# Altium PCB ISC-nRF52840-A-MODULE-Position-5.PcbDoc
Units mil, origin at the board's own origin, x right, y up, seen from the top; angles counter-clockwise.
Board outline 1740 x 1640 mil, 2 copper layers (Top Layer, Bottom Layer); 1 components, 0 nets, 55 pads, 0 vias.
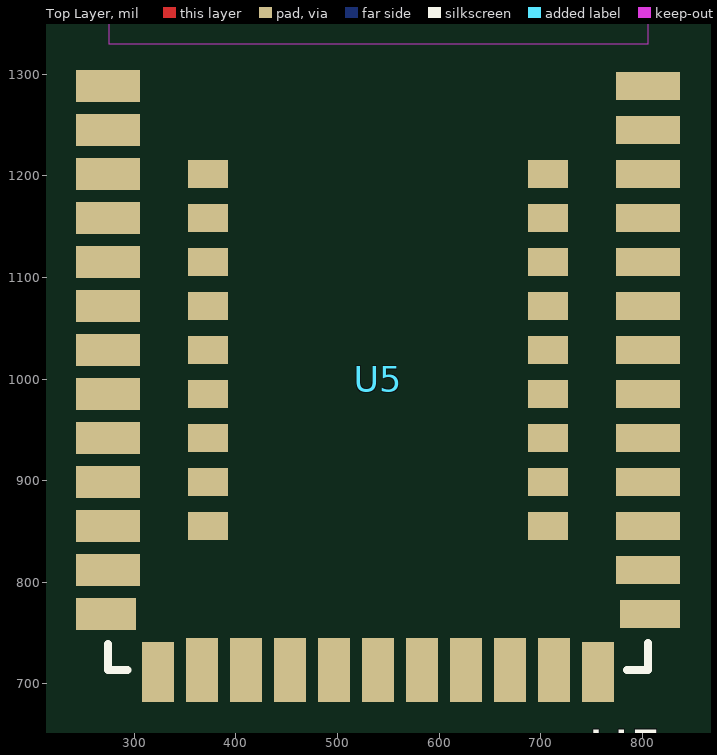
[diagram p0: Top Layer view]
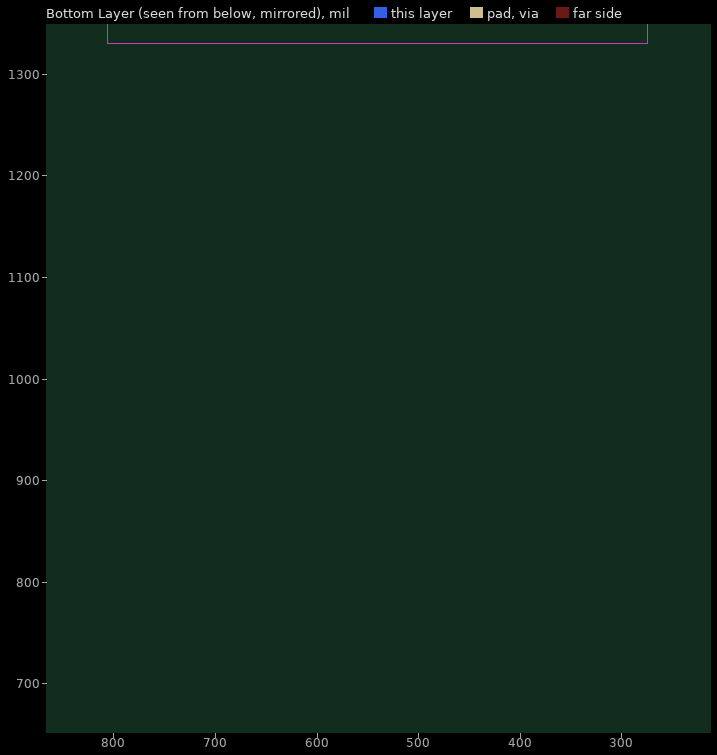
[diagram p1: Bottom Layer view, seen from below]

## Layer stack, top to bottom
Top Solder: solder mask 0.4, Solder Resist, Dk 3.5
Top Layer: signal copper 1.4
Dielectric 1: dielectric 12.6, FR-4, Dk 4.8
Bottom Layer: signal copper 1.4
Bottom Solder: solder mask 0.4, Solder Resist, Dk 3.5

## Board outline
0,0 1740,0 1740,1640 0,1640

## Design rules (kind name [scope] priority, off if disabled: settings)
Clearance [All] p1: gap=10 ignorepadtopadclearanceinfootprint=FALSE
PolygonConnect [All] p1: connectstyle=Relief reliefconductorwidth=10 reliefentries=4 polygonreliefangle="90 Angle" airgapwidth=10
RoutingVias [All] p1: holewidth=28 width=50 viastyle="Through Hole" minholewidth=28 minwidth=50 maxholewidth=28 maxwidth=50
SolderMaskExpansion [All] p1: expansion=4 istentingtop=FALSE
Width [All] p1: maxlimit=10 minlimit=10 preferedwidth=10
30 further rules are at their usual default settings.

## Components (designator, comment, footprint, x,y, rotation, side; value= is the part's Value field where it differs from the comment)
U5 "ISC-nRF52840-A" ISC-nRF52840-MODULE 540,1000 r0 top (schematic designator U1)

## Footprints (in the part's own frame and the unit in brackets; to place one, negate y for a bottom-side part, rotate by r counter-clockwise, add the part's x,y. Pads: shape width x height; smd on the part's side, far side on the other; paste and mask are expansions set on the pad)
ISC-nRF52840-MODULE [mm]
  rect 1.6x0.8 smd mask+0.05: 1(-6.75,7.325) 2(-6.75,6.225) 3(-6.75,5.125) 4(-6.75,4.025) 5(-6.75,2.925) 6(-6.75,1.825) 7(-6.75,0.725) 8(-6.75,-0.375) 9(-6.75,-1.475) 10(-6.75,-2.575) 11(-6.75,-3.675) 12(-6.75,-4.775)
  rect 1.5x0.8 smd mask+0.05: 13(-6.8,-5.875)
  rect 0.8x1.5 smd mask+0.05: 14(-5.5,-7.325) 24(5.5,-7.325)
  rect 0.8x1.6 smd mask+0.05: 15(-4.4,-7.275) 16(-3.3,-7.275) 17(-2.2,-7.275) 18(-1.1,-7.275) 19(0,-7.275) 20(1.1,-7.275) 21(2.2,-7.275) 22(3.3,-7.275) 23(4.4,-7.275)
  rect 1.5x0.7 smd mask+0.05: 25(6.8,-5.875)
  rect 1.6x0.7 smd mask+0.05: 26(6.75,-4.775) 27(6.75,-3.675) 28(6.75,-2.575) 29(6.75,-1.475) 30(6.75,-0.375) 31(6.75,0.725) 32(6.75,1.825) 33(6.75,2.925) 34(6.75,4.025) 35(6.75,5.125) 36(6.75,6.225) 37(6.75,7.325)
  rect 1x0.7 smd mask+0.05: 38(-4.25,5.125) 39(-4.25,4.025) 40(-4.25,2.925) 41(-4.25,1.825) 42(-4.25,0.725) 43(-4.25,-0.375) 44(-4.25,-1.475) 45(-4.25,-2.575) 46(-4.25,-3.675) 47(4.25,5.125) 48(4.25,4.025) 49(4.25,2.925) 50(4.25,1.825) 51(4.25,0.725) 52(4.25,-0.375) 53(4.25,-1.475) 54(4.25,-2.575) 55(4.25,-3.675)
  Keep-Out Layer region: -6.731,8.382 6.759,8.382 6.759,11.235 -6.731,11.235
  silkscreen extent -6.75,-7.27 6.75,-6.6, body extent -6.75,-7.38 6.75,11.12

## Part data
U5: library part ISC-nRF52840-A-MODULE

## Nets (pads, with @x,y where several pads share a name; then routed paths per layer and width w, separated by ;. In a path a pad name is that pad's centre, name@x,y a point inside that pad or via, vN(x,y) a via of type N, cw(c..) or ccw(c..) an arc to the next point about the centre after c; other vN are vias at no path point)
pads on no net: U5.1 U5.2 U5.3 U5.4 U5.5 U5.6 U5.7 U5.8 U5.9 U5.10 U5.11 U5.12 U5.13 U5.14 U5.15 U5.16 U5.17 U5.18 U5.19 U5.20 U5.21 U5.22 U5.23 U5.24 U5.25 U5.26 U5.27 U5.28 U5.29 U5.30 U5.31 U5.32 U5.33 U5.34 U5.35 U5.36 U5.37 U5.38 U5.39 U5.40 U5.41 U5.42 U5.43 U5.44 U5.45 U5.46 U5.47 U5.48 U5.49 U5.50 U5.51 U5.52 U5.53 U5.54 U5.55

## Other copper
Top Layer:
  text "NOTE: Antenna performance decreases if the position increases (e.g., position 1 gives higher performance)." at 3.74,-135.02 h78.74

## Silkscreen, mask and mechanical layers (free items; w line width, h text height)
Mechanical 1:
  the board outline again, w7.87
  text "↑Option 5. Placing in the center with no clearance area" at 0,-53.75 h60

## Text inside footprints (layer, text, board x,y; h text height)
U5: Mechanical 4 "ANTENNA" at 411,1365 h55.12